# Altium PCB Darlington.PcbDoc
Units mm, origin at the board's own origin, x right, y up, seen from the top; angles counter-clockwise.
Board outline 100 x 100 mm, 2 copper layers (Top Layer, Bottom Layer); 12 components, 7 nets, 31 pads, 0 vias.
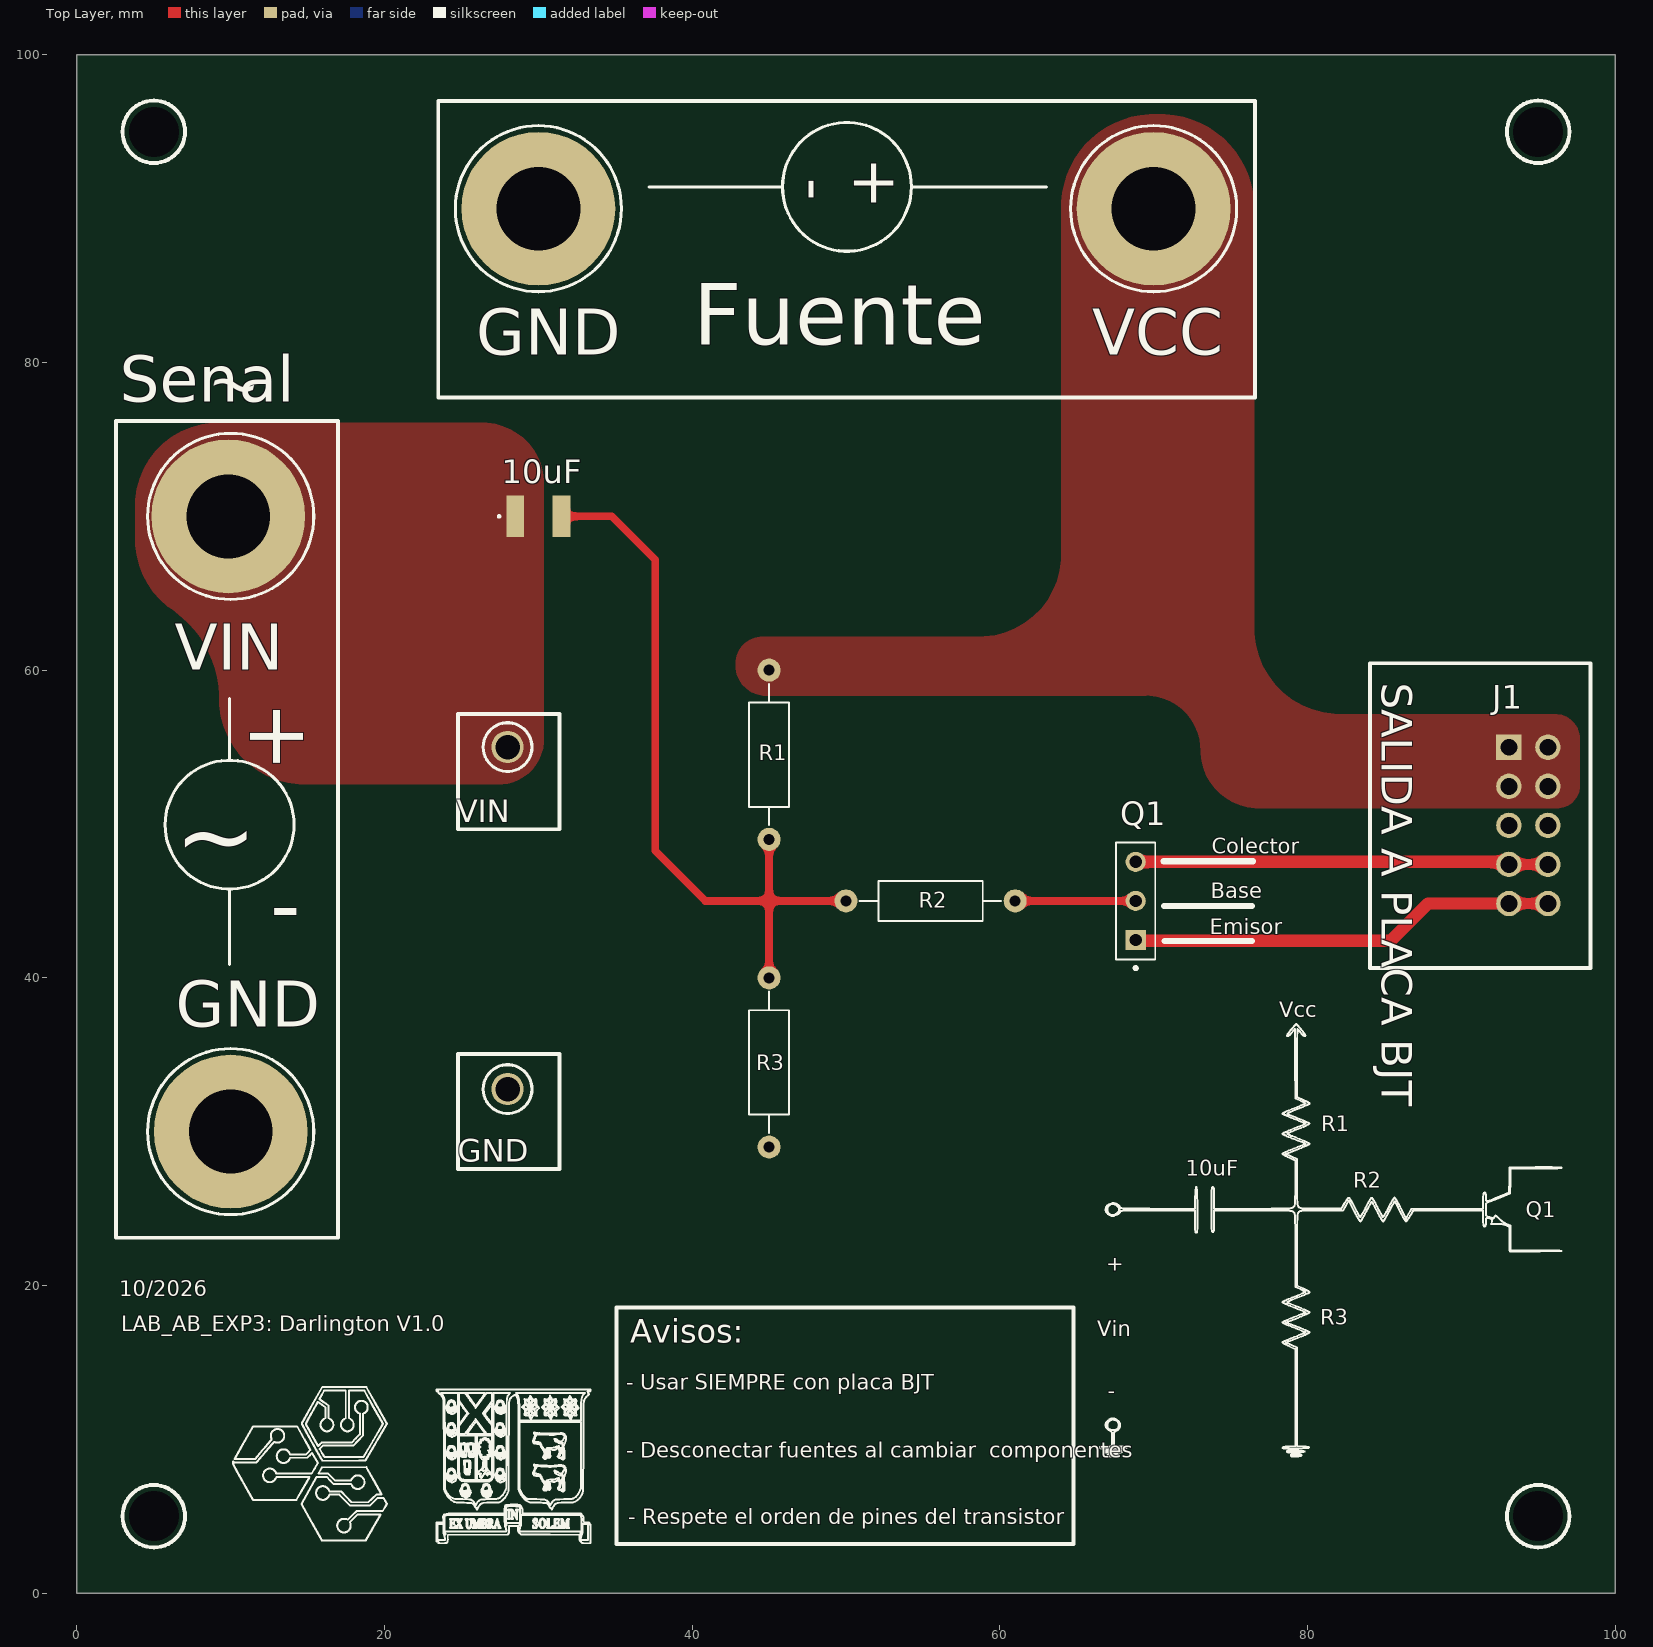
[diagram p0: Top Layer view]
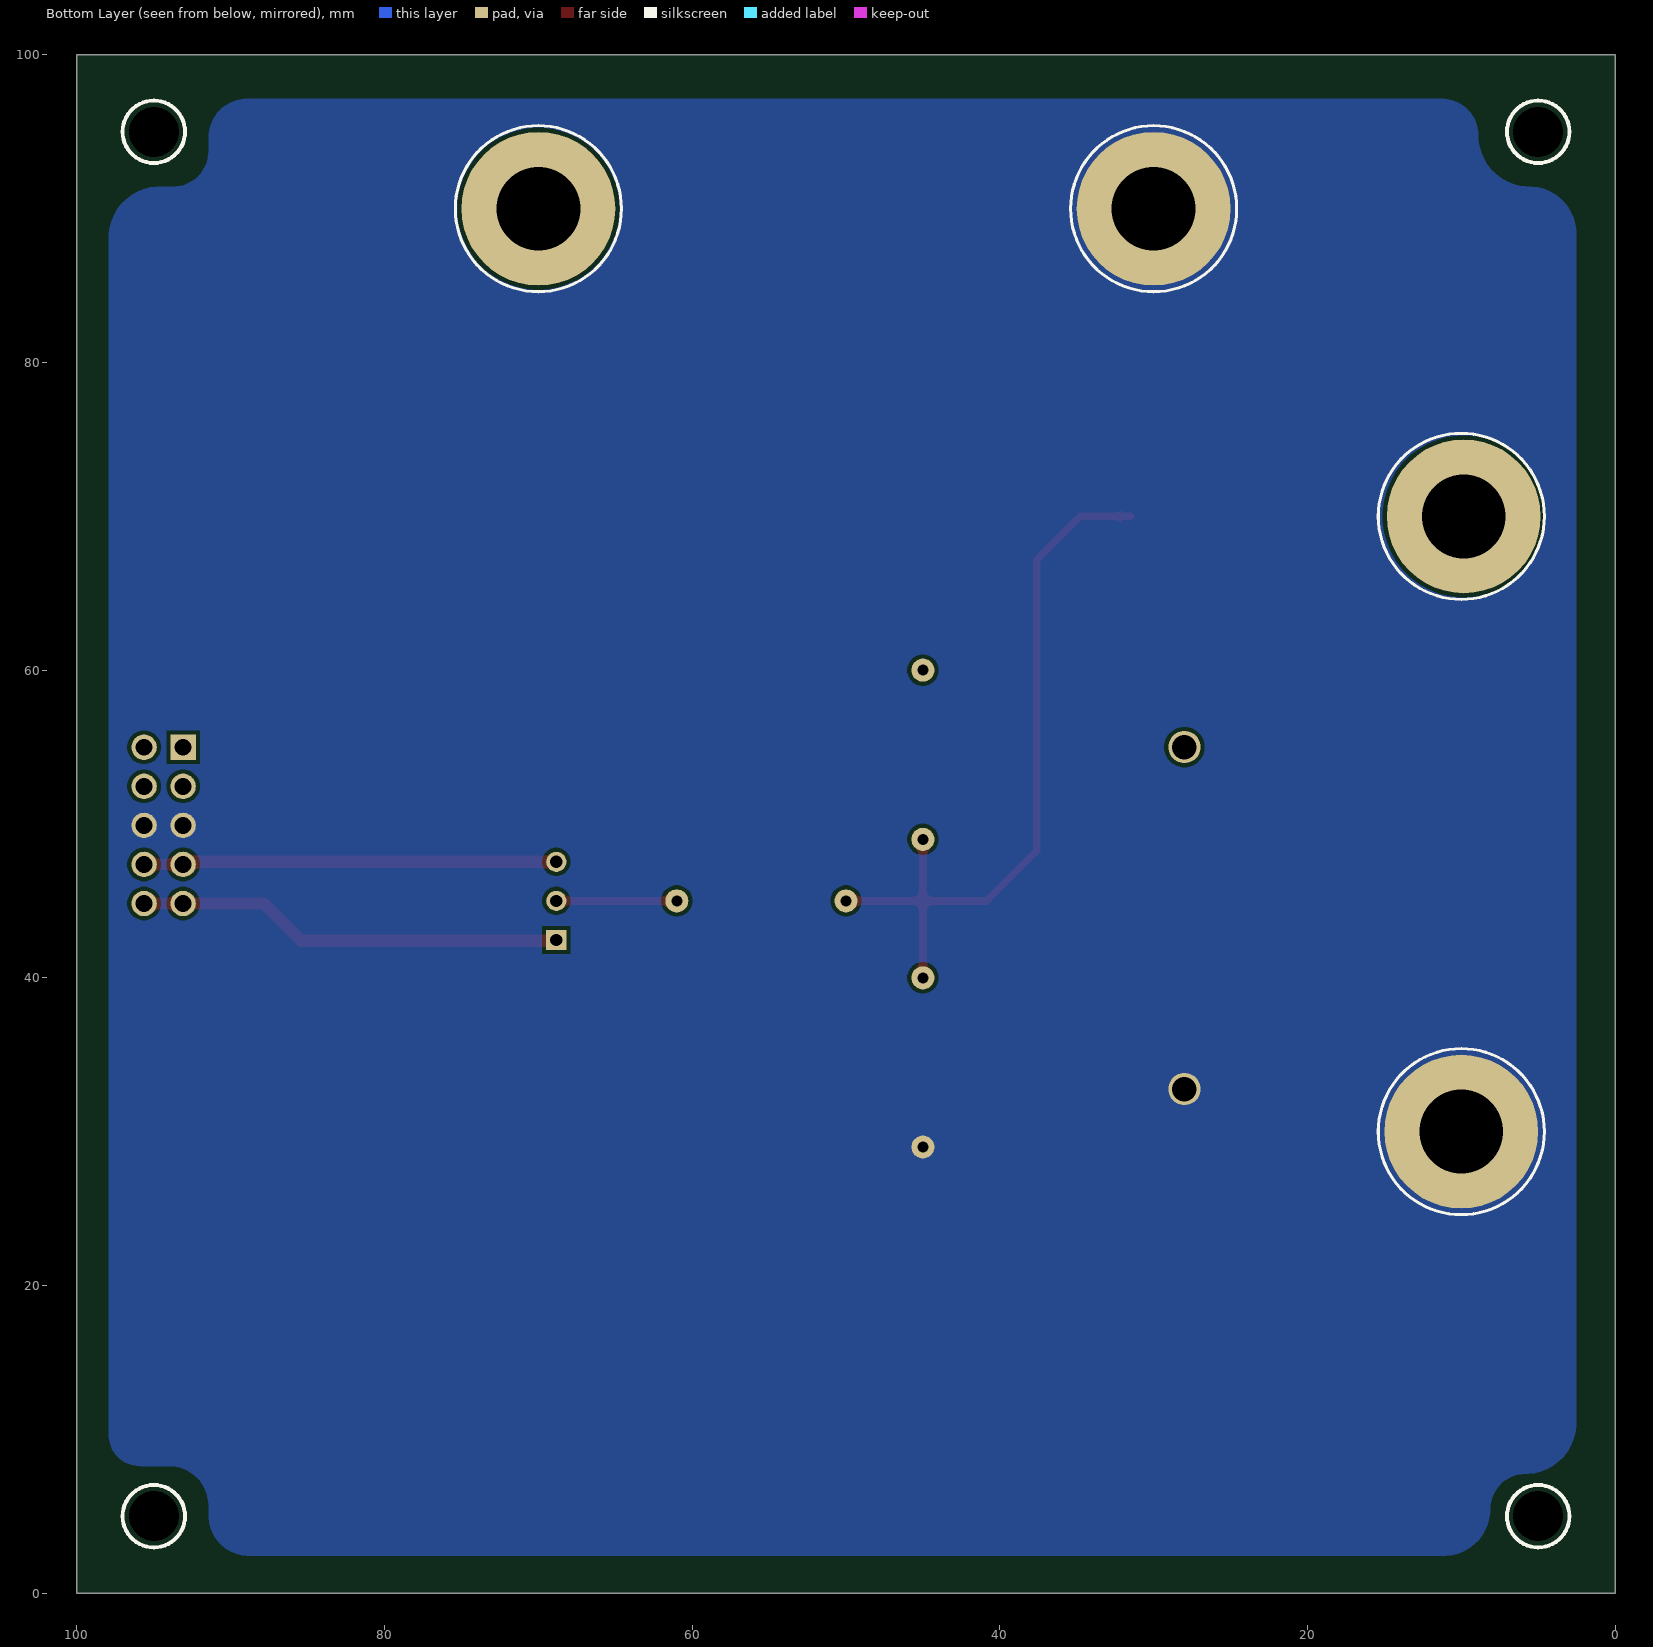
[diagram p1: Bottom Layer view, seen from below]

## Layer stack, top to bottom
Top Solder: solder mask 0.0102, Solder Resist, Dk 3.5
Top Layer: signal copper 0.0356
Dielectric 1: dielectric 0.32, FR-4, Dk 4.8
Bottom Layer: signal copper 0.0356
Bottom Solder: solder mask 0.0102, Solder Resist, Dk 3.5

## Board outline
0,0 100,0 100,100 0,100

## Design rules (kind name [scope] priority, off if disabled: settings)
Clearance [All] p1: gap=0.254 ignorepadtopadclearanceinfootprint=FALSE
HoleSize [All] p1: absolutevalues=TRUE maxlimit=7 minlimit=0.025 maxpercent=80.000 minpercent=20.000
PolygonConnect [All] p1: connectstyle=Direct reliefconductorwidth=0.254 reliefentries=4 polygonreliefangle="90 Angle" airgapwidth=0.254
RoutingVias [All] p1: holewidth=0.711 width=1.27 viastyle="Through Hole" minholewidth=0.711 minwidth=1.27 maxholewidth=0.711 maxwidth=1.27
SolderMaskExpansion [All] p1: expansion=0 istentingtop=FALSE
SupplyNets "Schematic Supply Nets_2" [InNet('+VAC')] p1: voltage=0.000
SupplyNets "Schematic Supply Nets_1" [InNet('VCC')] p2: voltage=0.000
SupplyNets "Schematic Supply Nets" [InNet('GND')] p3: voltage=0.000
Width [All] p1: maxlimit=0.7 minlimit=0.254 preferedwidth=0.254
29 further rules are at their usual default settings.

## Classes and differential pairs
component class Darlington: 10uF J1 Q6 R1 R2 R3 R12 R13 R14 VCC_IN VIN

## Components (designator, comment, footprint, x,y, rotation, side; value= is the part's Value field where it differs from the comment)
10uF "C1210C106M3PACTU" C1210 30,70 r0 top locked (schematic designator C2)
GND "5011" KSTN-5011_V 28,32.766 r180 top (schematic designator TP26)
GND "575-4" KSTN-575-4#1 30,90 r0 top locked (schematic designator TP24)
GND "575-4" KSTN-575-4#1 10,30 r0 top locked (schematic designator TP22)
J1 "PH2RA-10-UA" IDC_MACHO 93.091,54.991 r270 top locked (schematic designator J?)
Q1 "Zocalo_3pines" Zocalo_3pines 68.834,45 r270 top (schematic designator J1)
R1 "Zocalo_Resistencia_1/4W" Resistencia 45,60 r270 top
R2 "Zocalo_Resistencia_1/4W" Resistencia 50,45 r0 top
R3 "Zocalo_Resistencia_1/4W" Resistencia 45,40 r270 top
VCC "575-4" KSTN-575-4#1 70,90 r0 top locked (schematic designator TP23)
VIN "5010" KSTN-5010_V 28,55 r180 top (schematic designator TP25)
VIN "575-4" KSTN-575-4#2 10,70 r0 top locked (schematic designator TP21)

## Footprints (in the part's own frame and the unit in brackets; to place one, negate y for a bottom-side part, rotate by r counter-clockwise, add the part's x,y. Pads: shape width x height; smd on the part's side, far side on the other; paste and mask are expansions set on the pad)
C1210 [mm]
  rect 1.15x2.7 smd: 1(-1.5,0) 2(1.5,0)
  silkscreen extent -2.6,-0.05 -2.5,0.05, body extent -1.8,-1.4 1.8,1.4, height 2.1
IDC_MACHO [mm]
  rect 1.65x1.65 / inner round 1.65 / far side rect 1.65x1.65 hole 1.1: 1(0,0)
  round 1.65 hole 1.1: 2(0,2.54) 3(2.54,0) 4(2.54,2.54) 5(5.08,0) 6(5.08,2.54) 7(7.62,0) 8(7.62,2.54) 9(10.16,0) 10(10.16,2.54)
  body extent -1.46,-0.25 11.62,13.27, height 5.38
KSTN-575-4#1 [mm] "Banana Jack, Non-Insulated, Dia 7.92mm"
  round 10 hole 5.45: 1(0,0)
  silkscreen extent -5.4,-5.4 5.4,5.4, body extent -3.98,-3.96 3.92,3.94, height 2.36
KSTN-575-4#2 [mm] "Banana Jack, Non-Insulated, Dia 7.92mm"
  round 10 hole 5.45: 1(-0.16,0)
  silkscreen extent -5.4,-5.4 5.4,5.4, body extent -3.98,-3.96 3.92,3.94, height 2.36
KSTN-5010_V [mm] "Test Point, Dia 3.17mm"
  round 2.1 hole 1.6: 1(0,0)
  silkscreen extent -1.59,-1.58 1.59,1.58, body extent -1.59,-1.59 1.59,1.59, height 8.13
KSTN-5011_V [mm] "Test Point, Dia 3.17mm"
  round 2.1 hole 1.6: 1(0,0)
  silkscreen extent -1.59,-1.58 1.59,1.58, body extent -1.59,-1.59 1.59,1.59, height 8.13
Resistencia [mm]
  round 1.5 hole 0.711: 1(0,0) 2(11,0)
  silkscreen extent 0.89,-1.3 10.08,1.3, body extent -1.27,-1.27 12.27,1.27, height 6.39
Zocalo_3pines [mm]
  rect 1.308x1.308 / inner round 1.308 / far side rect 1.308x1.308 hole 0.8: 1(2.54,0)
  round 1.308 hole 0.8: 2(0,0) 3(-2.54,0)
  silkscreen extent -3.81,-1.27 4.47,1.27, body extent -3.81,-1.96 3.81,1.27, height 14

## Part data
10uF: "Capacitor", Manufacturer_Name="Yageo Group", Mouser Part Number=80-C1210C106M3P, Datasheet Link=https://www.yageogroup.com/content/datasheet/asset/file/KEM_C1006_X5R_SMD, Manufacturer_Part_Number=C1210C106M3PACTU, Mouser Price/Stock=https://www.mouser.com/Search/Refine.aspx?Keyword=80-C1210C106M3P
GND: library part CMP-1672-00003-4, "Test Point, Black, Through Hole, RoHS, Bulk", Colour=Black, Manufacturer=Keystone, Package Quantity=100, ComponentLink1Description="Manufacturer URL", ComponentLink1URL=http://www.keyelco.com/, ComponentLink2Description=Datasheet, ComponentLink2URL=http://www.keyelco.com/product-pdf.cfm?p=1320, Contact Material=Bronze, Contact Plating=Silver, DatasheetVersion="Rev. F, 12/2013", Height="8.12 mm", Mount="Through Hole", Mounting Technology="Through Hole", PackageDescription="1-Pin Through Hole Device, Dia 3.17 mm", PackageReference=5011, Packaging=Bulk, Pins=1, REACH SVHC="No SVHC", RoHSCompliant=true
GND GND VCC VIN: library part CMP-2000-05649-1, "Banana Jack, Non-Insulated, 1-Pin THD, RoHS, Bulk", Color=-, Manufacturer=Keystone-Electronics, Package Description="1-Pin Through Hole Device, Dia 7.92 mm", Package Version="Rev. B, 11/1994", Body Material=-, Category=Connectors,Interconnects, Contact Finish=Nickel, Contact Material=Brass, Datasheet URL=http://www.keyelco.com/product-pdf.cfm?p=2379, Datasheet Version="Rev. B, 11/1994", Family=BananaandTipConnectors-Jacks,Plugs, Features=-, Gender=Female, Insulation=Non-Insulated, Manufacturer URL=http://www.keyelco.com/, Mounting Technology=ThroughHole, Mounting Type=ThroughHole, Operating Temperature=-, Package Reference=575-4, Package URL=http://www.keyelco.com/product-pdf.cfm?p=2379, Packaging=Bulk, Plug/Mating Plug Diameter=StandardBanana, Series=-, Termination=Solder, Type=BananaJack, Wire Gauge=-
J1: library part IDC_MACHO, "CONN HEADER R/A 10POS 2.54MM", Manufacturer_Name="Adam Tech", Mouser Part Number=737-PH2RA-10-UA, Datasheet Link=https://app.adam-tech.com/products/download/data_sheet/200508/ph2ra-xx-ua-data-sheet.pdf, Geometry.Height=5.381mm, Manufacturer_Part_Number=PH2RA-10-UA, Mouser Price/Stock=https://www.mouser.co.uk/ProductDetail/Adam-Tech/PH2RA-10-UA?qs=HoCaDK9Nz5eXic%252Bmj6sc5g%3D%3D
Q1: Package=None, Availability=Unavailable, MP=D01-9970342, Price=None
R1 R2 R3: "1.07 kOhms Â±1% 0.25W, 1/4W Through Hole Resistor Axial - Metal Film", Package="RADIAL-2 YAGEO", Check_prices=https://www.snapeda.com/parts/MFR-25FBF52-1K/Yageo/view-part/?ref=eda, MF=Yageo, MP=MFR-25FBF52-1K, SnapEDA_Link=https://www.snapeda.com/parts/MFR-25FBF52-1K/Yageo/view-part/?ref=snap
VIN: library part CMP-1672-00002-4, "Test Point, Red, Through Hole, RoHS, Bulk", Colour=Red, Manufacturer=Keystone, Package Quantity=100, ComponentLink1Description="Manufacturer URL", ComponentLink1URL=http://www.keyelco.com/, ComponentLink2Description=Datasheet, ComponentLink2URL=http://www.keyelco.com/product-pdf.cfm?p=1319, Contact Material=Bronze, Contact Plating=Silver, DatasheetVersion="Rev. F, 12/2013", Height="8.12 mm", Mount="Through Hole", Mounting Technology="Through Hole", PackageDescription="1-Pin Through Hole Device, Dia 3.17 mm", PackageReference=5010, Packaging=Bulk, Pins=1, REACH SVHC="No SVHC", RoHSCompliant=true

## Free pads (board coordinates)
  round 0 hole 3.25: 9(5,5) 9(5,95) 9(95,5) 9(95,95)

## Nets (pads, with @x,y where several pads share a name; then routed paths per layer and width w, separated by ;. In a path a pad name is that pad's centre, name@x,y a point inside that pad or via, vN(x,y) a via of type N, cw(c..) or ccw(c..) an arc to the next point about the centre after c; other vN are vias at no path point)
+VAC: 10uF.1 VIN.1
Base: Q1.2 R2.2 | length 7.8
  Top Layer w0.5: R2.2 Q1.2
Center: 10uF.2 R1.2 R2.1 R3.1 | length 48.9
  Top Layer w0.5: 10uF.2 34.775,70 37.592,67.183 37.592,48.26 40.852,45 45,45 ; R3.1 45,45 ; R1.2 45,45 ; R2.1 45,45
ColectorDar: J1.7 J1.8 Q1.3 | length 26.8
  Top Layer w0.7: J1.7 J1.8
  Top Layer w0.8: Q1.3 J1.7@93.091,47.54
EmisorDar: J1.9 J1.10 Q1.1 | length 27.8
  Top Layer w0.5: Q1.1 Q1.1@68.876,42.418
  Top Layer w0.7: J1.9 J1.10
  Top Layer w0.8: Q1.1@68.876,42.418 85.42,42.418 87.833,44.831 J1.9
GND: GND.1 J1.5 J1.6 R3.2
VCC: J1.1 J1.2 J1.3 J1.4 R1.1 VCC.1

## Polygon pours and split planes (outlines as drawn)
VCC on Top Layer "VCC_L01_P006" (solid, pour order 6): 70.002,96.139 70.46,96.139 cw(c70.46,90.068) 76.53,90.068 76.53,62.738 ccw(c82.118,62.738) 82.118,57.15 96.063,57.15 cw(c96.063,55.499) 97.714,55.499 97.714,52.527 cw(c96.215,52.527) 96.215,51.029 76.835,51.029 cw(c76.835,54.813) 73.05,54.813 ccw(c69.52,54.813) 69.52,58.344 44.78,58.344 cw(c44.78,60.3) 42.824,60.3 42.824,60.427 cw(c44.577,60.427) 44.577,62.179 58.649,62.179 ccw(c58.649,67.539) 64.008,67.539 64.008,90.145 cw(c70.002,90.145)
+VAC on Top Layer "+VAC_L01_P000" (solid, pour order 0): 9.144,76.073 26.416,76.073 cw(c26.416,72.136) 30.353,72.136 30.353,55.499 cw(c27.432,55.499) 27.432,52.578 14.789,52.578 cw(c14.789,58.096) 9.271,58.096 ccw(c2.18,58.096) 6.186,63.947 cw(c9.271,68.453) 3.81,68.453 3.81,70.739 cw(c9.144,70.739)
GND on Bottom Layer "GND_L02_P003" (solid, pour order 3): 5.588,91.44 ccw(c5.588,94.742) 8.89,94.742 cw(c11.303,94.742) 11.303,97.155 88.9,97.155 cw(c88.9,94.615) 91.44,94.615 91.44,93.726 ccw(c93.726,93.726) 93.726,91.44 94.615,91.44 cw(c94.615,88.138) 97.917,88.138 97.917,10.287 cw(c95.885,10.287) 95.885,8.255 93.98,8.255 ccw(c93.98,5.715) 91.44,5.715 91.44,5.08 cw(c88.773,5.08) 88.773,2.413 11.176,2.413 cw(c11.176,5.461) 8.128,5.461 ccw(c5.842,5.461) 5.842,7.747 cw(c5.842,11.049) 2.54,11.049 2.54,88.392 cw(c5.588,88.392)

## Silkscreen, mask and mechanical layers (free items; w line width, h text height)
Top Overlay:
  drawing of 26174 lines, arcs and shapes, not listed
  text "+" at 53.526,92.913 h3 r180
  text "-" at 48.853,90.518 h3 r90
  text "Fuente" at 40.081,81.153 h4
  text "~" at 8.232,77.641 h3 r346.5
  text "Senal" at 2.794,77.454 h3
  text "SALIDA A PLACA BJT" at 84.836,59.182 h2 r270
  text "+" at 11.264,57.971 h4 r270
  text "~" at 11.738,52.507 h8 r180
  text "Colector" at 73.787,48.057 h1
  text "-" at 14.562,45.822 h4 r180
  text "Base" at 73.711,45.187 h1
  text "Emisor" at 73.66,42.824 h1
  text "Vcc" at 78.156,37.44 h1
  text "R1" at 80.889,30.033 h1
  text "10uF" at 72.082,27.117 h1
  text "R2" at 82.979,26.355 h1
  text "Q1" at 94.18,24.424 h1
  text "+" at 66.929,20.941 h1
  text "10/2026" at 2.743,19.304 h1
  text "R3" at 80.845,17.439 h1
  text "LAB_AB_EXP3: Darlington V1.0" at 2.87,17.021 h1
  text "Vin" at 66.345,16.688 h1
  text "Avisos:" at 35.966,16.281 h1.52
  text "- Usar SIEMPRE con placa BJT" at 35.712,13.233 h1
  text "-" at 67.031,12.657 h1
  text "- Desconectar fuentes al cambiar  componentes" at 35.712,8.788 h1
  text "- Respete el orden de pines del transistor" at 35.839,4.47 h1
Bottom Overlay:
  circle w0.254: c95,95 r2.031
  circle w0.254: c95,5 r2.031
  circle w0.254: c5,95 r2.031
  circle w0.254: c5,5 r2.031